# Altium PCB PCB1.PcbDoc
Units mm, origin at the board's own origin, x right, y up, seen from the top; angles counter-clockwise.
Board outline 132.5 x 90 mm, 2 copper layers (Top Layer, Bottom Layer); 10 components, 4 nets, 18 pads, 0 vias.
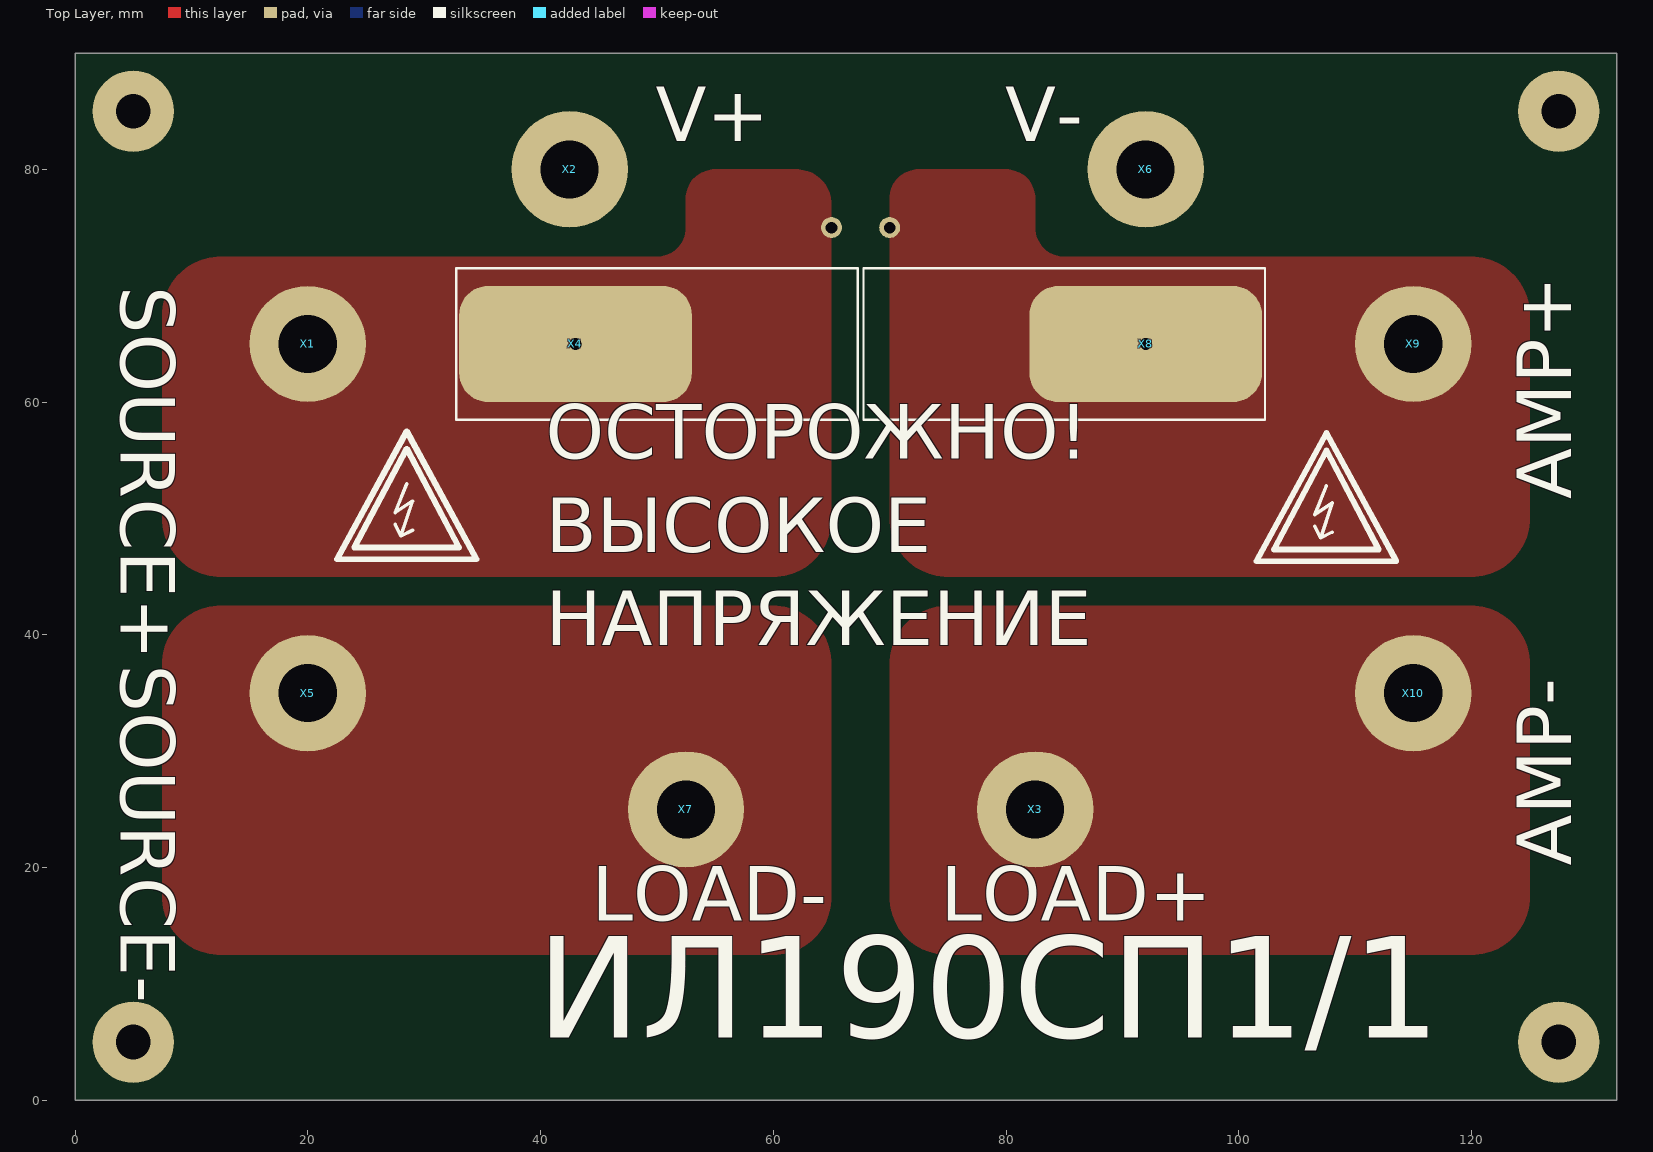
[diagram p0: Top Layer view]
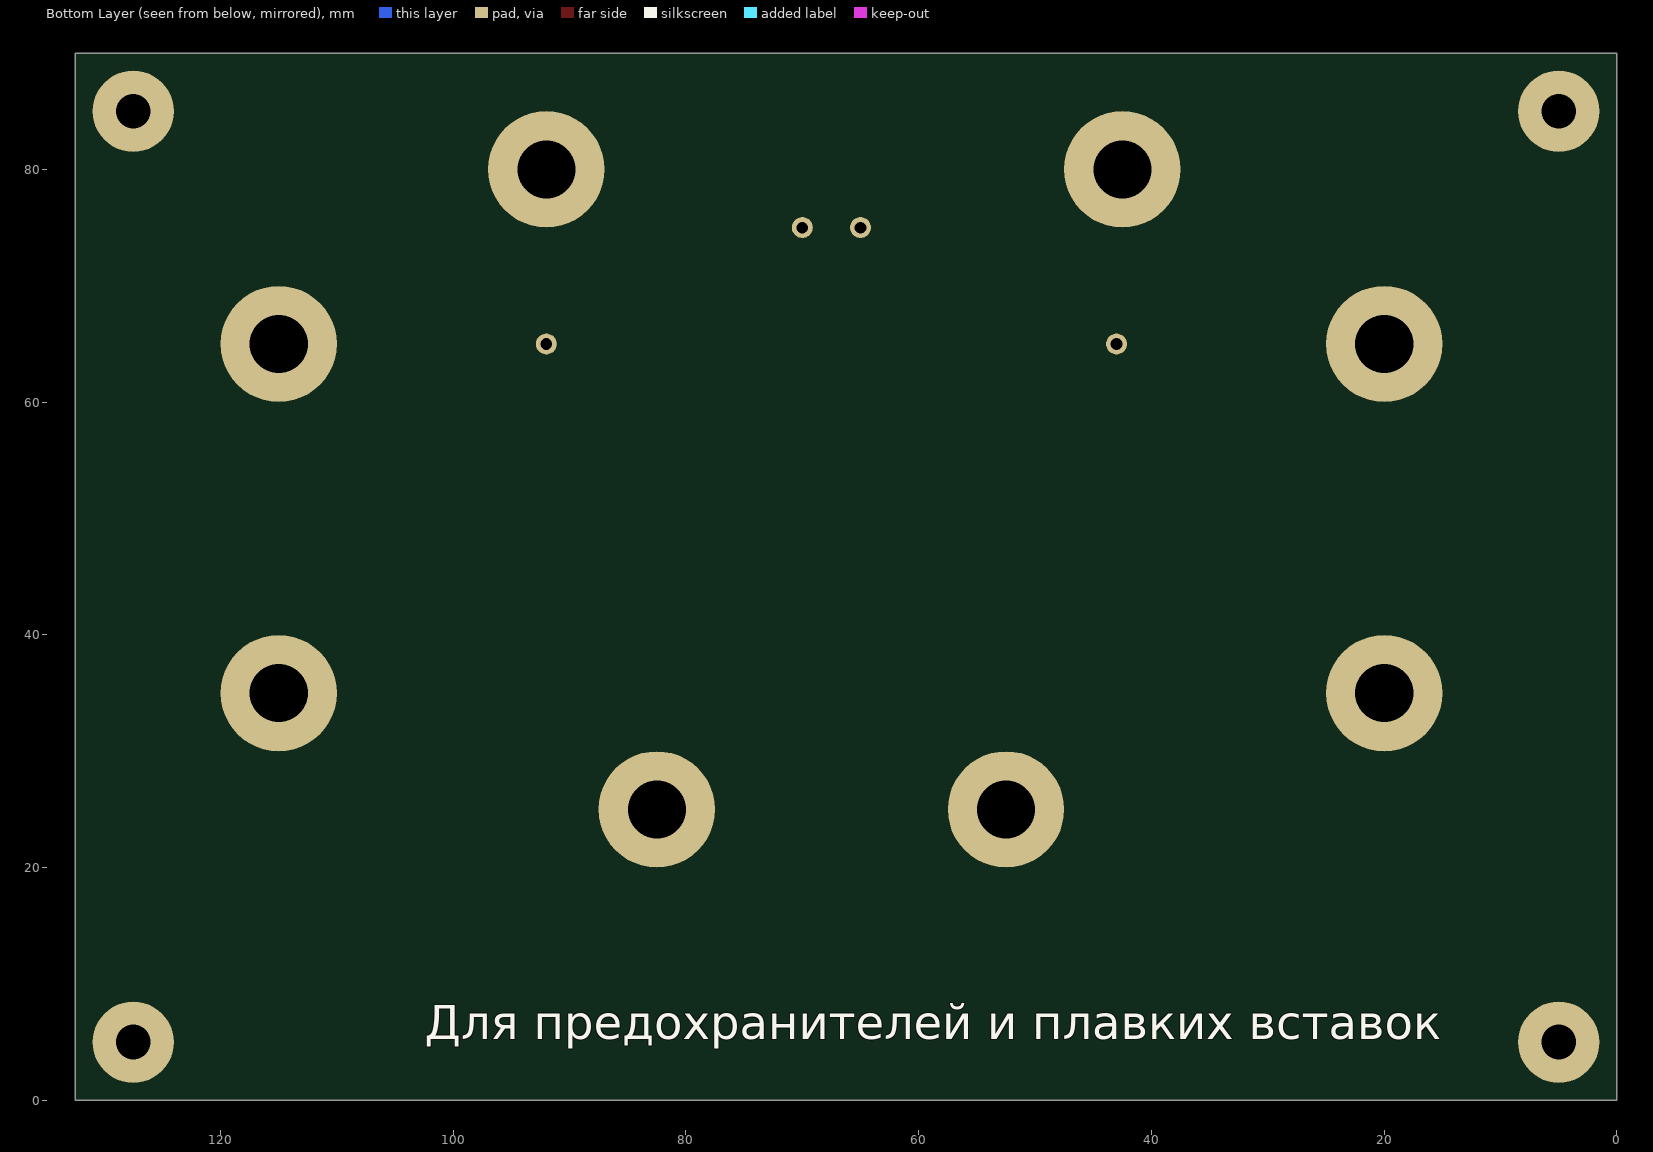
[diagram p1: Bottom Layer view, seen from below]

## Layer stack, top to bottom
Top Solder: solder mask 0.0102, Solder Resist, Dk 3.5
Top Layer: signal copper 0.0356
Dielectric 1: dielectric 0.32, FR-4, Dk 4.8
Bottom Layer: signal copper 0.0356
Bottom Solder: solder mask 0.0102, Solder Resist, Dk 3.5

## Board outline
0,0 132.5,0 132.5,90 0,90

## Design rules (kind name [scope] priority, off if disabled: settings)
Clearance [All] p1: gap=0.2 ignorepadtopadclearanceinfootprint=FALSE except(0: Arc-Hole Track-Hole SMDPad-Hole THPad-Hole Via-Hole Fill-Hole Poly-Hole Region-Hole Text-Hole)
ComponentClearance [All] p1: gap=0 collisioncheckmode=3 verticalgap=0 showdistances=FALSE
HoleSize [All] p1: absolutevalues=TRUE maxlimit=15 minlimit=0.025 maxpercent=80.000 minpercent=20.000
PolygonConnect [All] p1: connectstyle=Direct reliefconductorwidth=0.254 reliefentries=4 polygonreliefangle="90 Angle" airgapwidth=0.254
RoutingVias [All] p1: holewidth=0.3 width=0.6 viastyle="Through Hole" minholewidth=0.3 minwidth=0.6 maxholewidth=1 maxwidth=2
SilkToSolderMaskClearance [IsPad] p1: minsilkscreentomaskgap=0 clearancetoexposedcopper=TRUE
SolderMaskExpansion [All] p1: expansion=0.102 istentingtop=FALSE
Width [All] p1: maxlimit=0.6 minlimit=0.3 preferedwidth=0.3
27 further rules are at their usual default settings.

## Components (designator, comment, footprint, x,y, rotation, side; value= is the part's Value field where it differs from the comment)
X1 "BP-BANAN" "BP BANAN" 20,65 r0 top
X2 "BP-BANAN" "BP BANAN" 42.5,80 r0 top
X3 "BP-BANAN" "BP BANAN" 82.5,25 r0 top
X4 "CK-S" CK-S 50,65 r0 top
X5 "BP-BANAN" "BP BANAN" 20,35 r0 top
X6 "BP-BANAN" "BP BANAN" 92,80 r0 top
X7 "BP-BANAN" "BP BANAN" 52.5,25 r0 top
X8 "CK-S" CK-S 85,65 r180 top
X9 "BP-BANAN" "BP BANAN" 115,65 r0 top
X10 "BP-BANAN" "BP BANAN" 115,35 r0 top

## Footprints (in the part's own frame and the unit in brackets; to place one, negate y for a bottom-side part, rotate by r counter-clockwise, add the part's x,y. Pads: shape width x height; smd on the part's side, far side on the other; paste and mask are expansions set on the pad)
"BP BANAN" [mm]
  round 10 hole 5: 1(0,0)
  body extent -7.25,-7.25 7.25,7.25, height 23.73
CK-S [mm]
  rrect50% 20x10 smd: 1(-7,0)
  silkscreen extent -17.25,-6.5 17.25,6.5

## Free pads (board coordinates)
  round 7 hole 3 unplated: 0(5,5) 0(5,85) 0(127.5,5) 0(127.5,85)
  round 1.8 hole 1: 0(43,65) 0(92,65) 1(70,75) 2(65,75)

## Nets (pads, with @x,y where several pads share a name; then routed paths per layer and width w, separated by ;. In a path a pad name is that pad's centre, name@x,y a point inside that pad or via, vN(x,y) a via of type N, cw(c..) or ccw(c..) an arc to the next point about the centre after c; other vN are vias at no path point)
AMP+: pad.0@92,65 pad.1 X8.1 X9.1
AMP-: X3.1 X10.1
FUSE+: pad.0@43,65 pad.2 X1.1 X4.1
GND: X5.1 X7.1
pads on no net: X2.1 X6.1

## Polygon pours and split planes (outlines as drawn)
AMP- on Top Layer "NONET_L-01_P-001" (solid, remove dead copper, pour order 3): 70,37.5 70,17.5 ccw(c75,17.5) 75,12.5 120,12.5 ccw(c120,17.5) 125,17.5 125,37.5 ccw(c120,37.5) 120,42.5 75,42.5 ccw(c75,37.5)
FUSE+ on Top Layer "NONET_L-01_P-001" (solid, remove dead copper, pour order 1): 7.5,50 7.5,67.5 cw(c12.5,67.5) 12.5,72.5 50,72.5 ccw(c50,75) 52.5,75 52.5,77.5 cw(c55,77.5) 55,80 62,80 cw(c62,77) 65,77 65,50 cw(c60,50) 60,45 12.5,45 cw(c12.5,50)
AMP+ on Top Layer "NONET_L-01_P-001" (solid, remove dead copper, pour order 2): 82.5,75 82.5,77.5 ccw(c80,77.5) 80,80 72.5,80 ccw(c72.5,77.5) 70,77.5 70,50 ccw(c75,50) 75,45 120,45 ccw(c120,50) 125,50 125,67.5 ccw(c120,67.5) 120,72.5 85,72.5 cw(c85,75)
GND on Top Layer "NONET_L-01_P-001" (solid, remove dead copper, pour order 0): 7.5,37.5 7.5,17.51 ccw(c12.5,17.5) 12.5,12.5 60,12.5 ccw(c60,17.5) 65,17.5 65,37.5 ccw(c60,37.5) 60,42.5 12.5,42.5 ccw(c12.5,37.5)

## Silkscreen, mask and mechanical layers (free items; w line width, h text height)
Top Overlay:
  region: 52.5,44.5 53.5,44.5 54.5,44.5
  lines w0.3: 27.5,49.5 28,48.5 ; 28.5,53 27.5,50.5 29,51.5 28,48.5 ; 29,49 28,48.5 ; 106.534,49.336 107.034,48.336 ; 107.534,52.836 106.534,50.336 108.034,51.336 107.034,48.336 ; 108.034,48.836 107.034,48.336
  lines w0.5: 22.5,46.5 28.5,57.5 34.5,46.5 22.5,46.5 ; 24,47.5 28.5,56 33,47.5 24,47.5 ; 101.534,46.336 107.534,57.336 113.534,46.336 101.534,46.336 ; 103.034,47.336 112.034,47.336 107.534,55.836 103.034,47.336
  text "V+" at 49.893,80.871 h8
  text "V-" at 79.93,80.871 h8
  text "SOURCE+" at 2.371,69.977 h8 r270
  text "AMP+" at 130.129,51.649 h8 r90
  text "ОСТОРОЖНО! / ВЫСОКОЕ / НАПРЯЖЕНИЕ" at 40.447,37.576 h8
  text "SOURCE-" at 2.371,37.44 h8 r270
  text "AMP-" at 130.129,20.149 h8 r90
  text "LOAD-" at 44.419,13.871 h8
  text "LOAD+" at 74.382,13.871 h8
  text "ИЛ190СП1/1" at 39.675,2.507 h15
Bottom Overlay:
  text "Для предохранителей и плавких вставок" at 102.432,4.283 h5
Board:
  the board outline again, w0.2

## Dimensions
132.5,90.5 to 132.5,0 on Dimension
0,90 to 132.5,90.5 on Dimension